# Altium PCB PCB.PcbDoc
Units mm, origin at the board's own origin, x right, y up, seen from the top; angles counter-clockwise.
Board outline 60.96 x 64.13 mm, 2 copper layers (Top Layer, Bottom Layer), stack 1.569 mm thick; 39 components, 24 nets, 102 pads, 8 vias.
Unrouted connection lines stored in the file: 11.
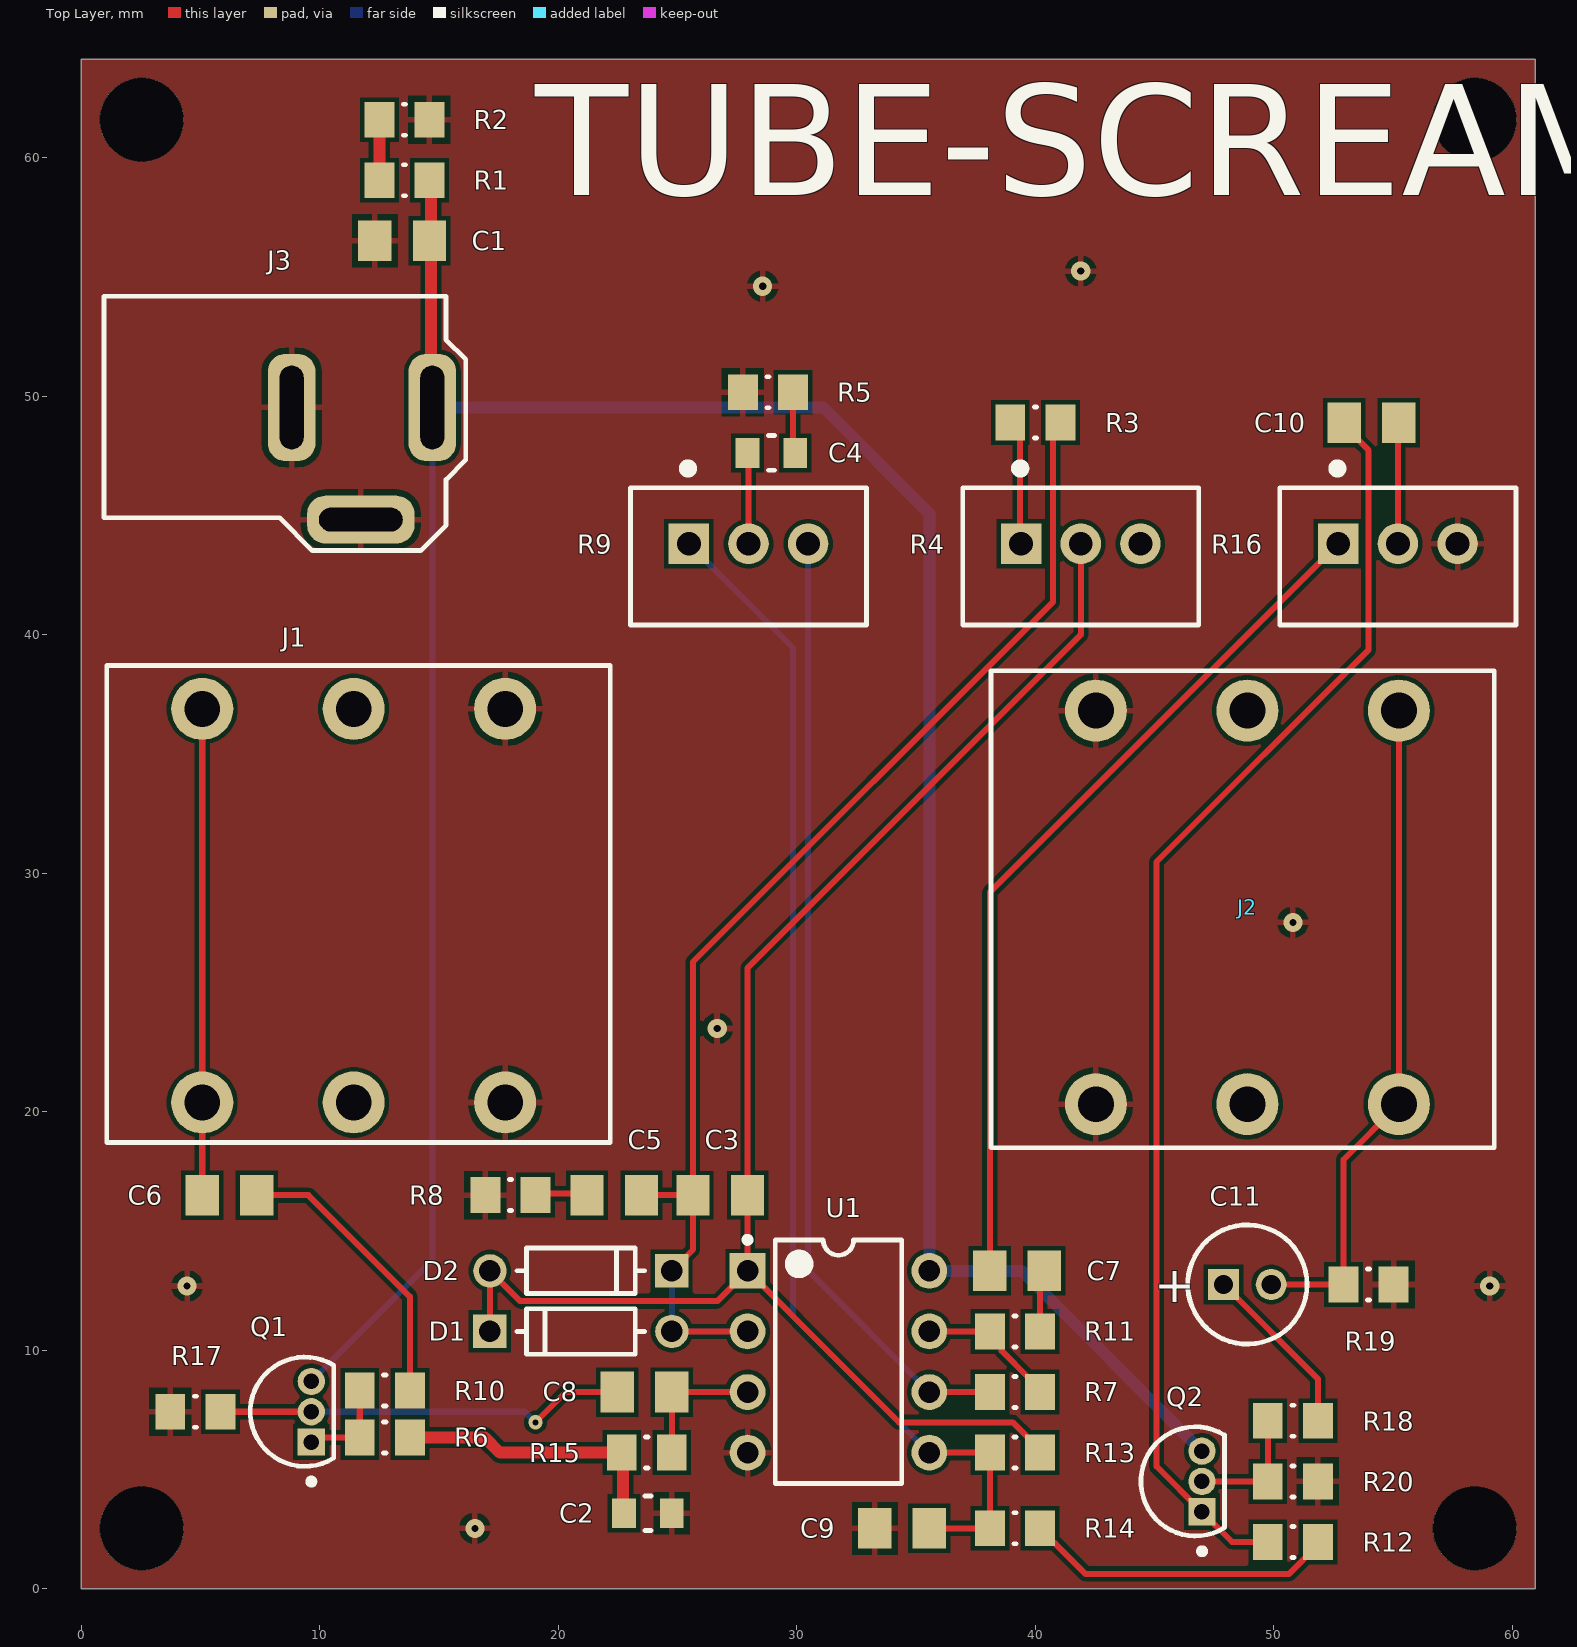
[diagram p0: Top Layer view]
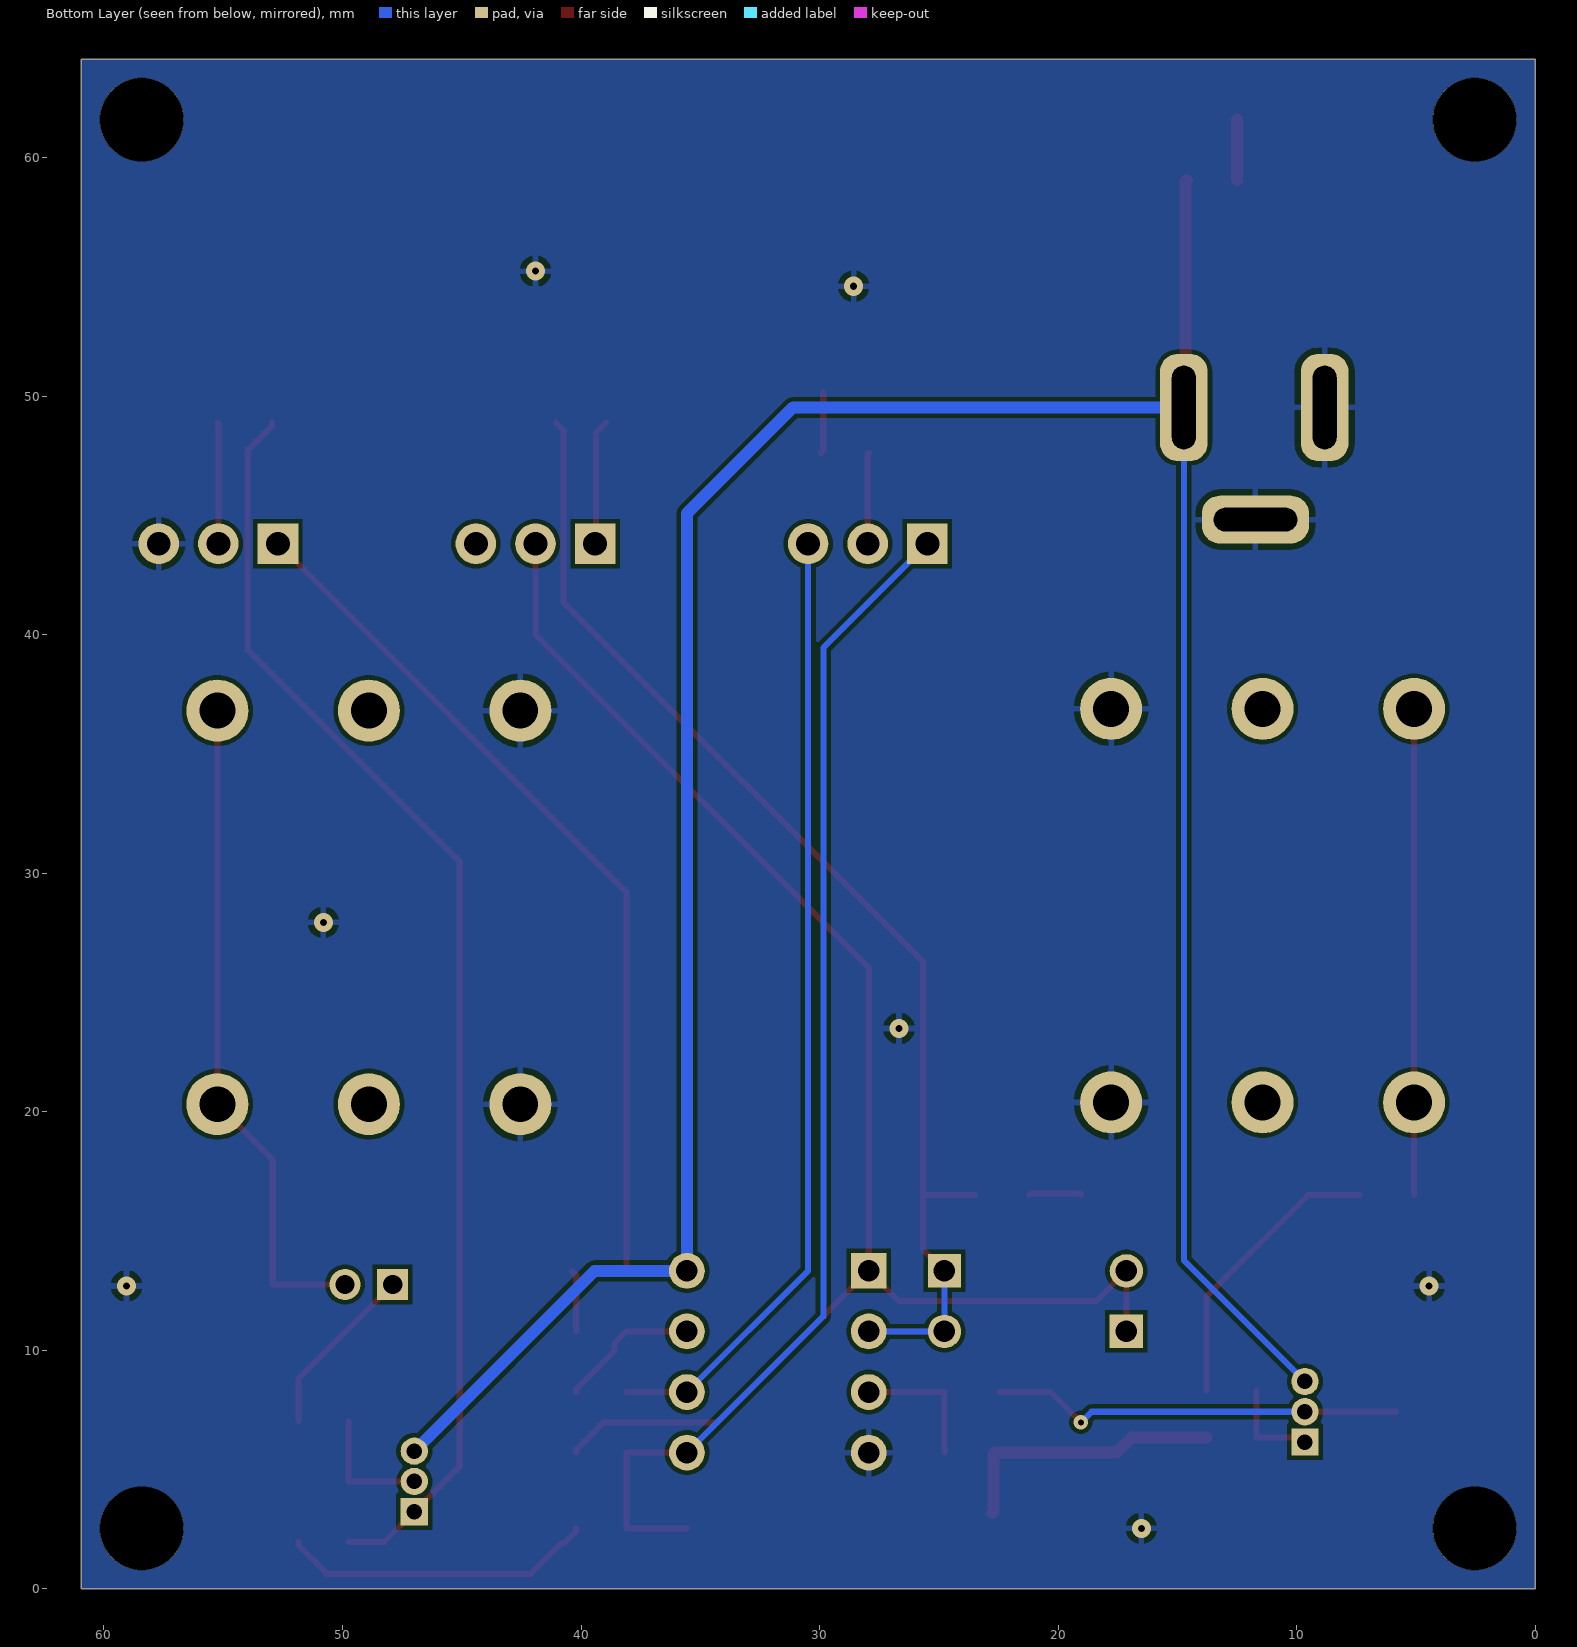
[diagram p1: Bottom Layer view, seen from below]

## Layer stack, top to bottom
Top Solder: solder mask 0.0254, SM-001, Dk 4
Top Layer: signal copper 0.035
Dielectric 1: core 1.4986, Core-043, Dk 4.3
Bottom Layer: signal copper 0.035
Bottom Solder: solder mask 0.0254, SM-001, Dk 4

## Board outline
0,0 0,64.135 60.96,64.135 60.96,0

## Design rules (kind name [scope] priority, off if disabled: settings)
Clearance DRV_PWR_CLR_INT [(InNetClass('140V') AND (OnLayer('Mid-Layer 1') OR OnLayer('Mid-Layer 2')))] p1: gap=0.203 ignorepadtopadclearanceinfootprint=FALSE except(0: Arc-Hole Track-Hole SMDPad-Hole THPad-Hole Via-Hole Fill-Hole Poly-Hole Region-Hole Text-Hole)
Clearance DRV_PWR_CLR [(InNetClass('140V') AND (OnLayer('Bottom Layer') OR OnLayer('Top Layer')))] p2: gap=0.432 ignorepadtopadclearanceinfootprint=FALSE except(0: Arc-Hole Track-Hole SMDPad-Hole THPad-Hole Via-Hole Fill-Hole Poly-Hole Region-Hole Text-Hole)
Clearance [All] p3: gap=0.178 ignorepadtopadclearanceinfootprint=FALSE except(0: Arc-Hole Track-Hole SMDPad-Hole THPad-Hole Via-Hole Fill-Hole Poly-Hole Region-Hole Text-Hole)
ComponentClearance [All] p1: gap=0.127 collisioncheckmode=3 verticalgap=0.127 showdistances=FALSE
MinimumSolderMaskSliver [All] p1: minsoldermaskwidth=0.076
PolygonConnect [All] p1: connectstyle=Relief reliefconductorwidth=0.254 reliefentries=4 polygonreliefangle="90 Angle" airgapwidth=0.254
RoutingVias DRV_PWR_RoutingVias [(InNetClass('140V') AND (InNet('ACT_PWR') OR InNet('ACT_RTN') OR InNet('CH1_PHASE_A') OR InNet('CH1_PHASE_B') OR InNet('CH1_PHASE_C') OR InNet('CH2_PHASE_A') OR InNet('CH2_PHASE_B') OR InNet('CH2_PHASE_C') OR InNet('DIVERT_1_CURRENT_SENSE') OR InNet('DIVERT_2_CURRENT_SENSE')))] p1: holewidth=0.635 width=1.27 viastyle="Through Hole" minholewidth=0.635 minwidth=1.27 maxholewidth=0.635 maxwidth=1.27
RoutingVias [All] p2: holewidth=0.254 width=0.508 viastyle="Through Hole" minholewidth=0.254 minwidth=0.508 maxholewidth=0.254 maxwidth=0.508
SilkToSilkClearance [All] p1: silktosilkclearance=0
SilkToSolderMaskClearance SilkscreenOverComponentPads [IsPad] p1: minsilkscreentomaskgap=0.254 clearancetoexposedcopper=TRUE
SolderMaskExpansion [All] p1: expansion=0.102 istentingtop=FALSE
SupplyNets "Schematic Supply Nets_2" [InNet('9V')] p1: voltage=0.000
SupplyNets "Schematic Supply Nets_1" [InNet('GND')] p2: voltage=0.000
SupplyNets "Schematic Supply Nets" [InNet('4.5V')] p3: voltage=0.000
Width DRV_PWR [InNetClass('140V')] p1: maxlimit=6.35 minlimit=0.254 preferedwidth=0.762
Width Digital [InNetClass('Digital')] p2: maxlimit=0.199 minlimit=0.132 preferedwidth=0.164 minimp=45.000000 maximp=55.000000 favimp=50.000000
Width [All] p3: maxlimit=6.35 minlimit=0.127 preferedwidth=0.254
26 further rules are at their usual default settings.

## Components (designator, comment, footprint, x,y, rotation, side; value= is the part's Value field where it differs from the comment)
C1 "100nF" CAP_0805 13.462,56.515 r0 top
C2 "EMK212BB7106MG-T" FP-0805-L_2_0_0_2-W_1_25-MFG 23.765,3.175 r0 top value=47uF
C3 "51pF" CAP_0805 26.797,16.51 r0 top
C4 "EMK212BB7106MG-T" FP-0805-L_2_0_0_2-W_1_25-MFG 28.94,47.625 r0 top value=220nF
C5 "47nF" CAP_0805 22.352,16.51 r0 top
C6 "20nF" CAP_0805 6.223,16.51 r0 top
C7 "1uF" CAP_0805 39.243,13.335 r180 top
C8 "1uF" CAP_0805 23.622,8.255 r0 top
C9 "220nF" CAP_0805 34.417,2.54 r0 top
C10 "100nF" CAP_0805 54.102,48.895 r180 top
C11 "ECA-1HHG010" CAPPR55-200-1100X500X1200 48.895,12.762 r0 top value=10uF
D1 "1N4148" FP-017AG-MFG 20.952,10.795 r0 top
D2 "1N4148" FP-017AG-MFG 20.952,13.335 r180 top
J1 "NYS218" NYS218-Footprint-1 5.08,36.892 r0 top
J2 "NYS218" NYS218-Footprint-1 55.245,20.32 r180 top
J3 "DC-005-5A-3.0" DC-005-5A-3.0 14.728,49.53 r0 top
Q1 "2N5088" UNIC-TO-92-3 9.652,7.428 r270 top
Q2 "2N5088" UNIC-TO-92-3 46.99,4.507 r270 top
R1 "10K" RESC_M-Footprint-1 13.555,59.055 r180 top
R2 "10K" RESC_M-Footprint-1 13.555,61.595 r0 top
R3 "51K" RESC_M-Footprint-1 40.005,48.895 r0 top
R4 "PDB241-GTR01-504A2" FP-B3B-XH-A_LF_SN-MFG 41.91,43.29 r0 top value=500k
R5 "200" RESC_M-Footprint-1 28.795,50.165 r0 top
R6 "510K" RESC_M-Footprint-1 12.734,6.35 r180 top
R7 "1K" RESC_M-Footprint-1 39.15,8.255 r180 top
R8 "4.7K" RESC_M-Footprint-1 18,16.51 r180 top
R9 "PDB241-GTR01-504A2" FP-B3B-XH-A_LF_SN-MFG 27.98,43.29 r0 top value=20k
R10 "1K" RESC_M-Footprint-1 12.734,8.317 r0 top
R11 "1K" RESC_M-Footprint-1 39.15,10.795 r180 top
R12 "510K" RESC_M-Footprint-1 50.8,1.967 r180 top
R13 "1K" RESC_M-Footprint-1 39.15,5.715 r0 top
R14 "10K" RESC_M-Footprint-1 39.15,2.54 r0 top
R15 "10K" RESC_M-Footprint-1 23.715,5.715 r180 top
R16 "PDB241-GTR01-504A2" FP-B3B-XH-A_LF_SN-MFG 55.205,43.29 r0 top value=100k
R17 "10K" RESC_M-Footprint-1 4.792,7.428 r180 top
R18 "100" RESC_M-Footprint-1 50.8,7.047 r180 top
R19 "10K" RESC_M-Footprint-1 53.975,12.762 r180 top
R20 "10K" RESC_M-Footprint-1 50.8,4.507 r0 top
U1 "RC4558P" P0008A 31.75,9.525 r0 top

## Footprints (in the part's own frame and the unit in brackets; to place one, negate y for a bottom-side part, rotate by r counter-clockwise, add the part's x,y. Pads: shape width x height; smd on the part's side, far side on the other; paste and mask are expansions set on the pad)
CAP_0805 [mm]
  rect 1.4x1.7 smd: 1(-1.143,0) 2(1.143,0)
  body extent -1.15,-0.76 1.15,0.79, height 1.01
CAPPR55-200-1100X500X1200 [mm] "THD, 2-Leads, Dia 5mm, Pin Spacing 2mm"
  rect 1.3x1.3 hole 0.8: 1(-1,0)
  round 1.3 hole 0.8: 2(1,0)
  silkscreen extent -2.5,-2.5 2.5,2.5, body extent -2.5,-2.5 2.45,2.5, height 12
DC-005-5A-3.0 [mm]
  rrect75% 2x4.5 hole 1 slot 3.5 at 90 deg: 1(0,0) 2(-5.9,0)
  rrect75% 4.5x2 hole 1 slot 3.5 at 0 deg: 3(-3,-4.7)
  silkscreen extent -13.77,-6 1.4,4.67, body extent -13.65,-4.86 0.35,4.54, height 11.1
FP-017AG-MFG [mm]
  rect 1.4x1.4 hole 0.9: 1(-3.813,0)
  round 1.4 hole 0.9: 2(3.813,0)
  silkscreen extent -2.68,-0.95 2.68,0.95, body extent -4.51,-1.05 4.51,1.05, height 0.25
FP-0805-L_2_0_0_2-W_1_25-MFG [mm]
  rect 1x1.25 smd paste+0 mask+0: 1(-1,0) 2(1,0)
  silkscreen extent -0.13,-0.72 0.13,0.72, body extent -1.6,-0.82 1.6,0.82, height 0.25
FP-B3B-XH-A_LF_SN-MFG [mm]
  rect 1.7x1.7 hole 1: 1(-2.5,0.525)
  round 1.7 hole 1: 2(0,0.525) 3(2.5,0.525)
  silkscreen extent -4.95,-2.88 4.95,3.81, body extent -5.05,-2.98 5.05,2.98, height 0.25
NYS218-Footprint-1 [mm]
  round 2.6 hole 1.5: 1(0,-16.5) 1(0,0) 2(6.35,-16.5) 2(6.35,0) 3(12.7,-16.5) 3(12.7,0)
  silkscreen extent -4,-18.18 17.1,1.82, body extent -13.23,-18.18 20.97,1.82, height 16.92
P0008A [mm] "DIP, 8-Leads, Body 10.15x6.6mm, Pitch 2.54mm"
  rect 1.5x1.5 hole 0.9: 1(-3.81,3.81)
  round 1.5 hole 0.9: 2(-3.81,1.27) 3(-3.81,-1.27) 4(-3.81,-3.81) 5(3.81,-3.81) 6(3.81,-1.27) 7(3.81,1.27) 8(3.81,3.81)
  silkscreen extent -3.93,-5.1 2.65,5.23, body extent -4.84,-4.63 4.84,4.63, height 4.32
RESC_M-Footprint-1 [mm]
  rect 1.25x1.5 smd: 1(-1.05,0) 2(1.05,0)
  silkscreen extent -0.05,-0.65 0.05,0.65, body extent -1.1,-0.67 1.1,0.67, height 0.7
UNIC-TO-92-3 [mil] "TO-92, 3-Leads, Dia 4.58mm, Pitch 1.27mm"
  rect 45x45 hole 25.59 mask+0: 1(50,0)
  round 45 hole 25.59 mask+0: 2(0,0) 3(-50,0)
  silkscreen extent -90,-101 120,37, body extent -90,-102 91,37, height 285

## Part data
C1 C3 C5 C6 C7 C8 C9 C10: library part CMP-126-000013-1, "Capacitor SMD 0805 10V", Design Item ID=CAP_0805_10V, Source=Schematic-Lib-PhilsLab.SchLib
C2 C4: library part CMP-001-00093-1, "Multilayer Ceramic Capacitors MLCC - SMD/SMT 10uF 16Volts X7R +/-20% 0805 STD", Case Code (Imperial)=0805, Dielectric=X7R, Tolerance=20%, Voltage Rating=16V
C11: library part CMP-001-00024-5, "Aluminum Electrolytic Capacitor, 1 uF, +/- 20%, 50 V, -55 to 105 degC, 2-Pin THD, RoHS, Bulk", Capacitor Type=Electrolytic, Case/Package=Radial, Manufacturer=Panasonic, Max Operating Temperature=105°C, Min Operating Temperature=-55°C, Package Description="2-Pin Radial Lead, Dia 5 mm, Height 12 mm", Package Quantity=200, Package Reference=CAPPR55-200-1100X500X1200, Ripple Current=10mA, Tolerance=20%, Voltage Rating=50V, Datasheet URL=https://datasheet.ciiva.com/7275/94060-7275472.pdf, Datasheet Version=Mar-05, Diameter=5mm, Lead Pitch=2mm, Manufacturer URL=http://www.panasonic.com/, Mounting Technology=TH, Packaging=Bulk, Pins=2, Ripple Current (AC)=10mA, RoHS Compliant=True
D1 D2: library part DIODE-00000-1, "Rectifier Diode Single 2 EAR99 Diode Rectifier Diode 0.15A 0.004MUS 1V 150C", Case/Package=DO-214AC, Forward Current=200mA, Forward Voltage=1V, Max Operating Temperature=175°C, Max Surge Current=4A, Min Operating Temperature=-55°C, Power Dissipation=500mW, Reverse Voltage=100V, Mounting Technology="Through Hole", Output Current=200mA, Peak Non-Repetitive Surge Current=4A, Pins=2, Reverse Recovery Time=4ns
J1 J2: library part CONN-00000-1, "Audio Conn, Stereo Jack, 3P, 6.35MM, Pcb;", Color=Black, Max Operating Temperature=70°C, Min Operating Temperature=-20°C, Contact Material=Bronze, Contact Plating=Tin, Gender=Female, Housing Material=Polyamide, Mounting Technology="Through Hole", Number of Ports=1, Pins=1, Pitch=6.35mm
J3: library part CMP-127-000017-3, "DC Barrell Jack 6.2mm 5 A3.0mm Through Hole", Design Item ID=DC-005-5A-3.0, Parameter 1=XKB, Parameter 2=DC-005-5A-3.0, Source=Schematic-Lib-PhilsLab.SchLib
Q1 Q2: library part TRAN-00001-1, "Transistor GP BJT NPN 30V 50mA 3-Pin TO-92 Box", Case/Package=TO-92, Collector Emitter Breakdown Voltage=30V, MFR="CENTRAL SEMICONDUCTOR", MFR P/N=2N5088, Mounting Technology="Through Hole", Pins=3, Polarity=NPN, Transistor Type=NPN
R1 R2 R3 R5 R6 R7 R8 R10 R11 R12 R13 R14 R15 R17 R18 R19 R20: library part CMP-009-00178-1, "0805 SMT Resistor"
R4 R9 R16: library part CMP-009-00248-3, "Potentiometer Carbon Guitar 500 Kohms Knurled Shaft Solderlugs PDB241-GTR Series", Case/Package=DFS, Max Operating Temperature=70°C, Min Operating Temperature=-10°C, Power Rating=250mW, Tolerance=20%, Voltage Rating=250V, Actuator Diameter=5.9944mm, Actuator Length=18.9992mm, Depth=24mm, Diameter=24mm, Height=28mm, Hole Diameter=9.525mm, Length=30.5mm, Mounting Technology=Panel, Number of Turns=1, Taper=Audio, Technology="Thick film", Termination=Solder
U1: library part CMP-031-00011-1, "Dual, 30-V, 3-MHz, low noise (8-nV/√Hz) operational amplifier 8-PDIP 0 to 70", Case/Package=PDIP, Dual Supply Voltage=9V, Input Bias Current=500nA, Input Offset Voltage (Vos)=6mV, Max Dual Supply Voltage=15V, Max Operating Temperature=70°C, Min Dual Supply Voltage=5V, Min Operating Temperature=0°C, Voltage Gain=109.54dB, Bandwidth=3MHz, Common Mode Rejection Ratio=70dB, Gain Bandwidth Product=3MHz, Height=5.08mm, Length=9.81mm, Max Supply Voltage=15V, Nominal Gain Bandwidth Product=3MHz, Number of Circuits=2, Pins=8, Width=6.35mm

## Free pads (board coordinates)
  round 3.5 hole 3.5: 0(2.54,61.595) 0(2.54,2.54) 0(58.42,61.595) 0(58.42,2.54)

## Via types
v1: diameter 0.8, hole 0.3, Top Layer to Bottom Layer, tented both sides, 7 vias
v2: diameter 0.6, hole 0.254, Top Layer to Bottom Layer, tented both sides, 1 vias

## Nets (pads, with @x,y where several pads share a name; then routed paths per layer and width w, separated by ;. In a path a pad name is that pad's centre, name@x,y a point inside that pad or via, vN(x,y) a via of type N, cw(c..) or ccw(c..) an arc to the next point about the centre after c; other vN are vias at no path point)
4.5V: C2.1 R1.2 R2.1 R6.1 R12.1 R14.2 R15.2 | length 27.4
  Top Layer w0.254: R14.2 40.2,2.415 40.698,1.917 40.823,1.917 42.105,0.635 50.643,0.635 51.85,1.842 R12.1
  Top Layer w0.5: R1.2 R2.1 ; R6.1 16.922,6.35 17.557,5.715 R15.2 22.715,5.665 22.715,3.225 C2.1
9V: C1.2 J3.1 Q1.3 Q2.3 R1.1 U1.8 | length 121.5
  Top Layer w0.5: R1.1 14.666,58.994 14.666,49.591 J3.1
  Bottom Layer w0.254: Q1.3 14.728,13.774 J3.1
  Bottom Layer w0.5: J3.1 31.115,49.53 35.56,45.085 U1.8 39.432,13.335 Q2.3
GND: C1.1 C2.2 C9.1 J1.3 J2.3 J3.2 J3.3 R2.2 R5.1 R8.2 R16.3 R17.2 R19.1 R20.2 U1.4
  other v1: 16.51,2.54 4.445,12.7 59.055,12.7 26.67,23.495 50.8,27.94 28.575,54.61 41.91,55.245
NetC3_1: C3.1 C5.2 D1.2 D2.1 R3.2 U1.2 | length 53.4
  Top Layer w0.254: C5.2 C3.1 ; D1.2 U1.2 ; D2.1 25.654,14.224 C3.1 ; R3.2 40.738,48.578 40.738,41.373 25.654,26.289 C3.1
  Bottom Layer w0.254: D2.1 D1.2 U1.2
NetC3_2: C3.2 D1.1 D2.2 R4.2 R13.2 U1.1 | length 66.1
  Top Layer w0.254: D1.1 D2.2 18.409,12.065 26.67,12.065 U1.1 ; R13.2 40.2,5.84 39.055,6.985 34.29,6.985 31.427,9.848 U1.1 ; R4.2 41.91,40.005 27.94,26.035 C3.2 U1.1
NetC4_1: C4.1 R9.2 | length 3.8
  Top Layer w0.254: C4.1 27.98,47.585 R9.2
NetC4_2: C4.2 R5.2 | length 2.6
  Top Layer w0.254: R5.2 29.845,47.72 C4.2
NetC5_1: C5.1 R8.1 | length 2.2
  Top Layer w0.254: R8.1 19.05,16.572 21.147,16.572 C5.1
NetC6_1: C6.1 J1.1 | length 20.4
  Top Layer w0.254: C6.1 5.08,20.392 J1.1@5.08,36.892
NetC6_2: C6.2 R10.2 | length 12.1
  Top Layer w0.254: C6.2 9.525,16.51 13.784,12.251 R10.2
NetC7_1: C7.1 R11.1 | length 2.6
  Top Layer w0.254: R11.1 40.2,13.149 C7.1
NetC7_2: C7.2 R16.1 | length 36.5
  Top Layer w0.254: C7.2 38.1,29.21 R16.1
NetC8_1: C8.1 Q1.2 R17.1 | length 17.3
  Top Layer w0.254: R17.1 Q1.2 ; v2(19.05,6.985) 20.32,8.255 C8.1
  Bottom Layer w0.254: Q1.2 18.595,7.428 19.039,6.985 v2(19.05,6.985)
NetC8_2: C8.2 R15.1 U1.3 | length 5.7
  Top Layer w0.254: R15.1 C8.2 U1.3
NetC9_2: C9.2 R9.1 R13.1 R14.1 U1.5 | length 50.5
  Top Layer w0.254: C9.2 R14.1 R13.1 U1.5
  Bottom Layer w0.254: R9.1 29.845,39.45 29.845,11.43 U1.5
NetC10_1: C10.1 R16.2 | length 5.1
  Top Layer w0.254: R16.2 55.205,48.855 C10.1
NetC10_2: C10.2 Q2.1 R12.2 | length 53.8
  Top Layer w0.254: R12.2 48.26,1.967 Q2.1 45.085,5.142 45.085,30.48 53.975,39.37 53.975,47.729 52.959,48.745 C10.2
NetC11_1: C11.1 R18.1 | length 7.4
  Top Layer w0.254: C11.1 51.85,8.807 R18.1
NetC11_2: C11.2 J2.1 R19.2 | length 28
  Top Layer w0.254: C11.2 R19.2 52.925,18 55.245,20.32 J2.1@55.245,36.82
NetQ1_1: Q1.1 R6.2 R10.1 | length 4.1
  Top Layer w0.254: Q1.1 9.844,6.35 R6.2 R10.1
NetQ2_2: Q2.2 R18.2 R20.1 | length 5.3
  Top Layer w0.254: Q2.2 R20.1 R18.2
NetR3_1: R3.1 R4.1 | length 5.3
  Top Layer w0.254: R3.1 39.37,48.48 39.37,43.855 R4.1
NetR7_1: R7.1 R11.2 U1.7 | length 6
  Top Layer w0.254: U1.7 R11.2 38.598,10.297 38.598,9.977 39.697,8.878 39.702,8.878 40.2,8.38 R7.1
NetR7_2: R7.2 R9.3 U1.6 | length 40.2
  Top Layer w0.254: U1.6 R7.2
  Bottom Layer w0.254: R9.3 30.48,13.335 U1.6
pads on no net: J1.2 J2.2 R4.3

## Polygon pours and split planes (outlines as drawn)
GND on Bottom Layer "GND" (solid, remove dead copper, pour order 0): 0,0 0,64.135 60.96,64.135 60.96,0
GND on Top Layer "GND" (solid, remove dead copper, pour order 1): 0,0 0,64.135 60.96,64.135 60.96,0

## Silkscreen, mask and mechanical layers (free items; w line width, h text height)
Top Overlay:
  text "TUBE-SCREAMER" at 19.05,56.89 h8
Fab 2 Title:
  drawing of 529 lines, arcs and shapes, not listed
  text "THIS DOCUMENT AND ALL DATA DISCLOSED / WITHIN ARE THE PROPERTY OF CSUS AND SHALL  / NOT TO BE REPRODUCED, USED, OR DISCLOSED  / IN WHOLE OR IN PART WITHOUT THE / PERMISSION OF CSUS." at -321.437,347.534 h2.54
  text "CSUS" at 361.188,-132.526 h19.05
  text ".Cage_Code" at 332.829,-149.671 h7.62
  text ".Fab_Number" at 382.245,-149.671 h7.62
  text ".FAB_SIZE" at 318.491,-149.75 h7.62
  text ".Category" at 362.551,-149.75 h7.62
  text ".PCBRev" at 458.648,-149.75 h7.62
  text "OF" at 448.818,-161.256 h3.81
  text "2" at 441.833,-161.742 h6.35
  text ".FAB_NUM_SHEETS" at 458.978,-161.742 h6.35

## Text inside footprints (layer, text, board x,y; h text height)
C11: Top Overlay "+" at 44.987,12.025 h1.5